# Altium PCB STM32H743I-EVAL2PCBDESIGN.PcbDoc (part 20 of 23)
Units mil, origin at the board's own origin, x right, y up, seen from the top; angles counter-clockwise.
Board outline 6558 x 5417 mil, 8 copper layers (L1_TOP, L2_GND, L3_HS1, L4_POWER, L5_SIG, L6_HS2, L7_GND, L8_BOTTOM), stack 61.368 mil thick; 620 components, 588 nets, 2945 pads, 1724 vias.
Unrouted connection lines stored in the file: 1.
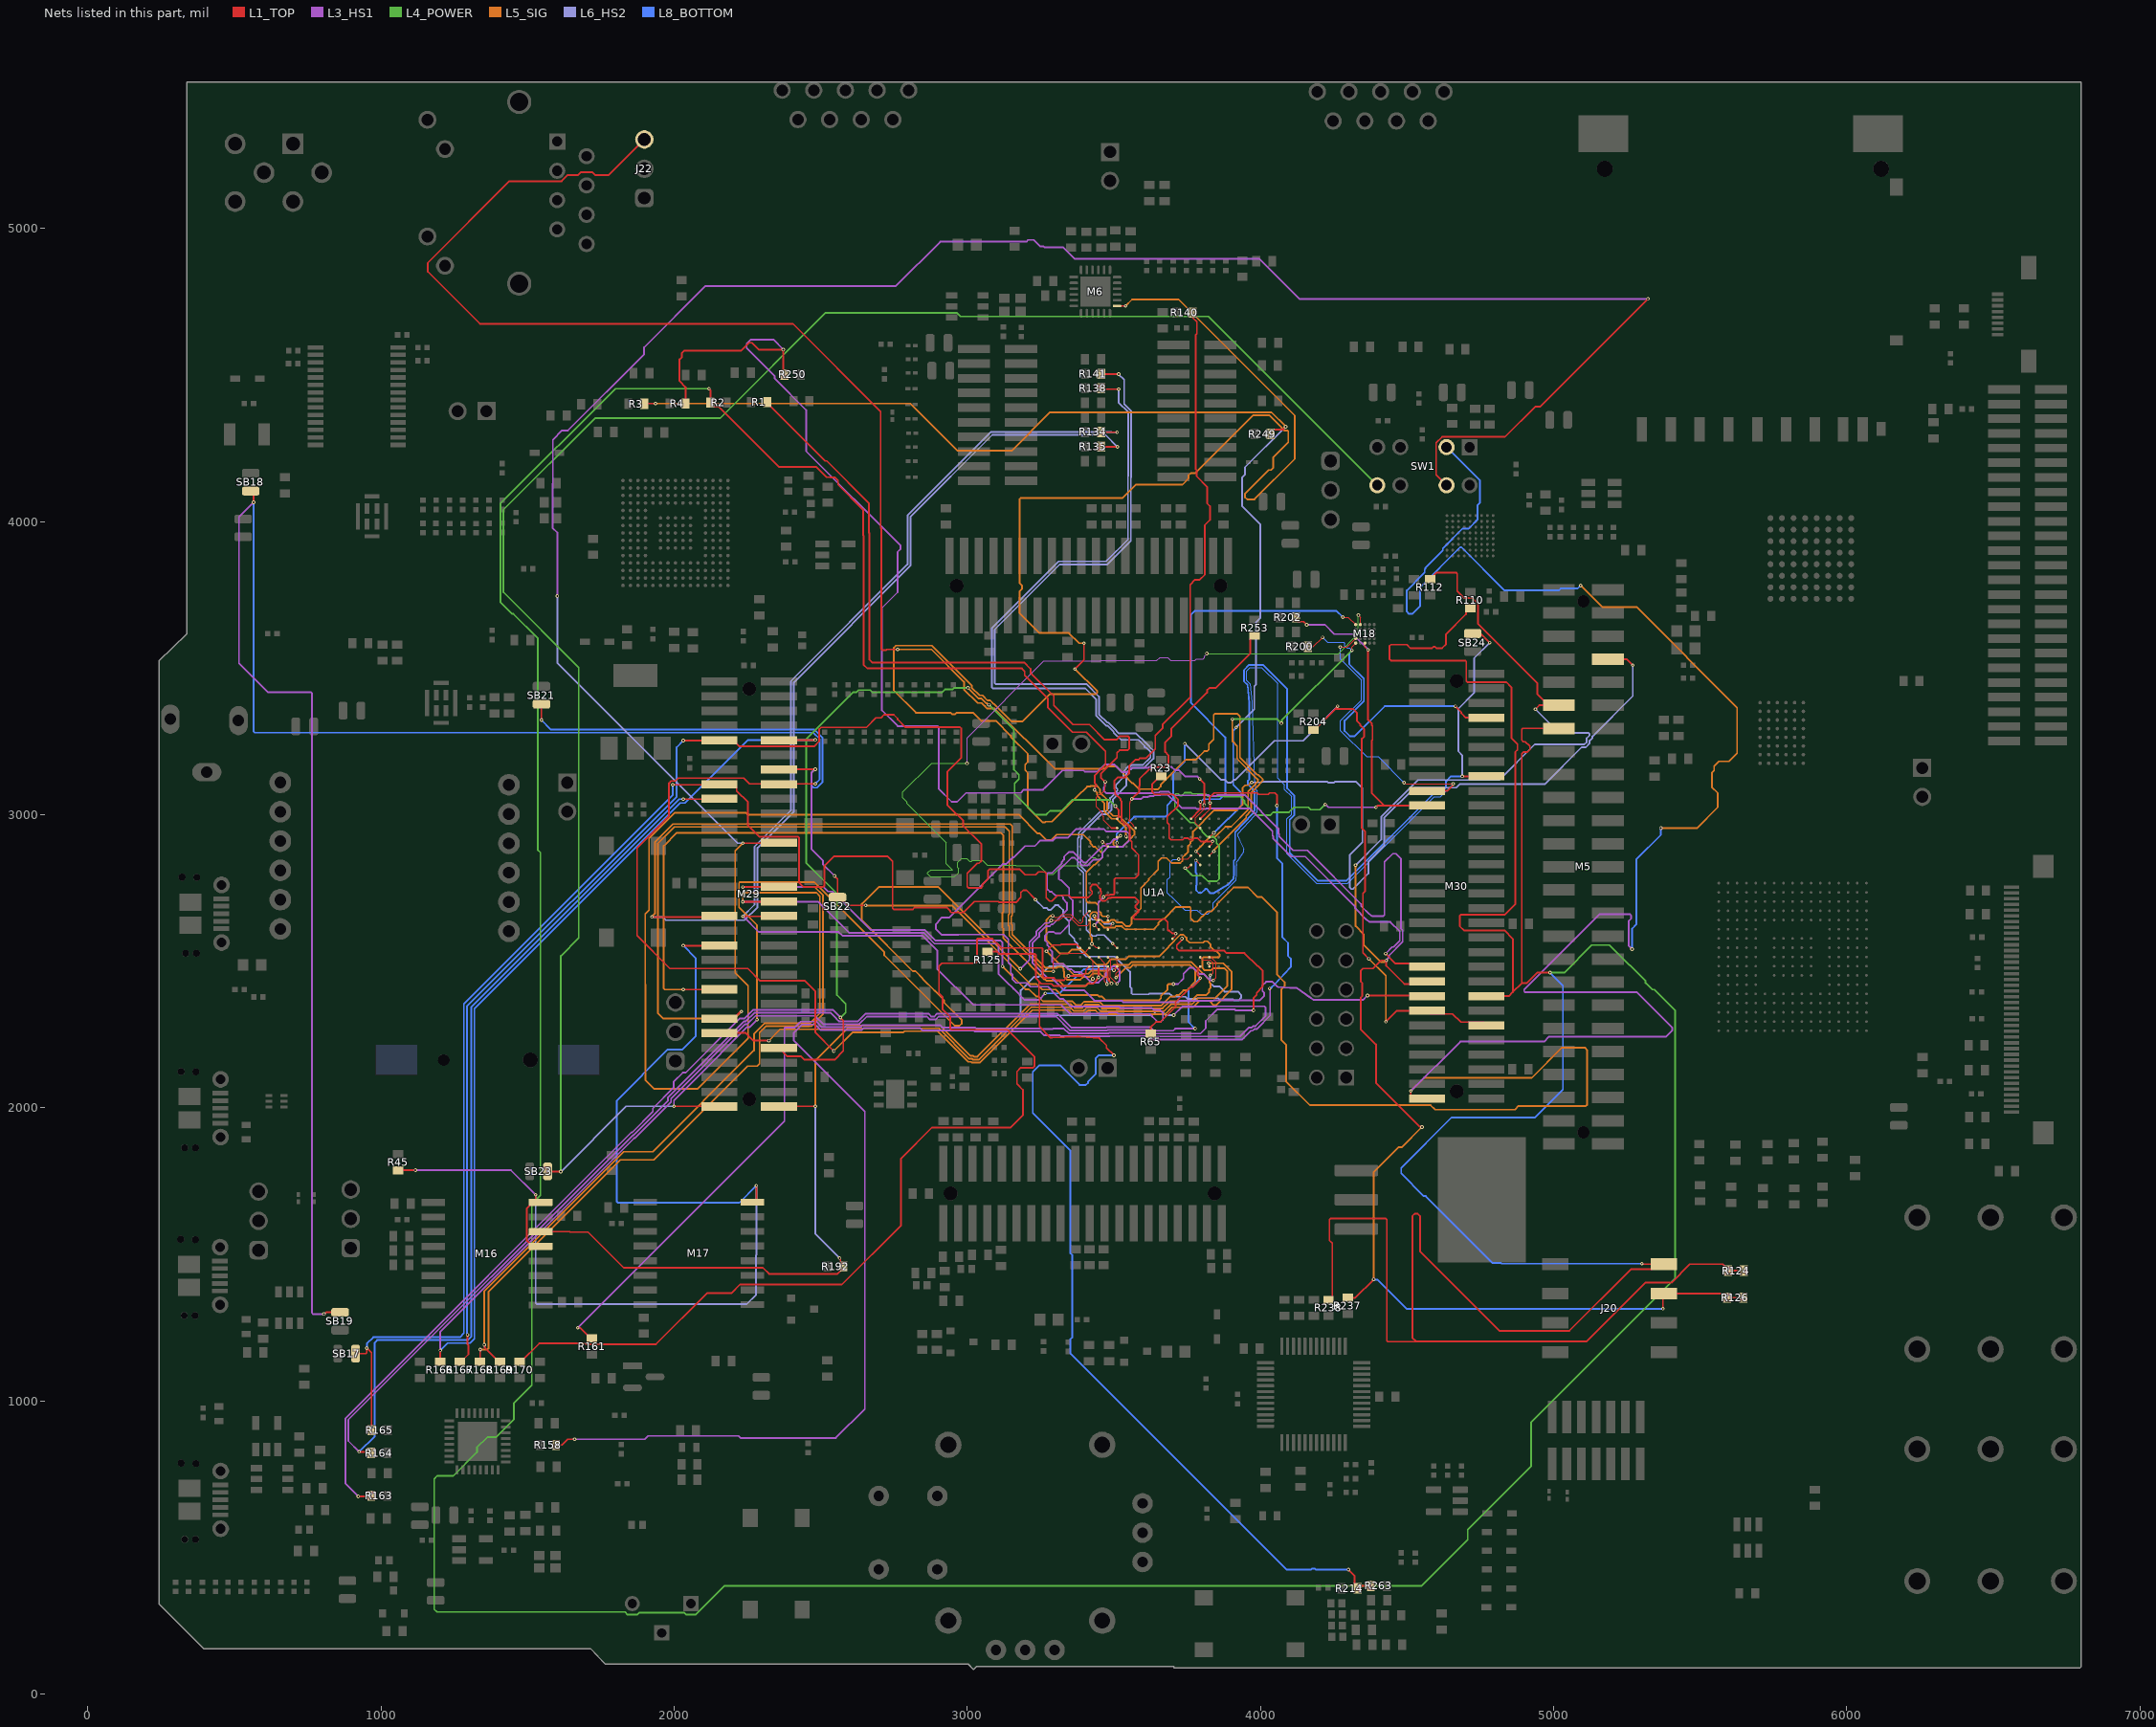
[diagram p17: the nets of this part, all layers, seen from the top]

## Via types
v1: diameter 12, hole 6, L1_TOP to L8_BOTTOM, tented both sides, 1724 vias

## Nets (pads, with @x,y where several pads share a name; then routed paths per layer and width w, separated by ;. In a path a pad name is that pad's centre, name@x,y a point inside that pad or via, vN(x,y) a via of type N, cw(c..) or ccw(c..) an arc to the next point about the centre after c; other vN are vias at no path point) (continued)
PA1: R141.1 U1A.N4 | length 2928.2
  L1_TOP w2: U1A.N4@3479.54,2608.02 3479.54,2609.78 3496,2626.24 v1(3496,2628)
  L1_TOP w6: R141.1@3456.56,4504 3457.56,4503 v1(3516,4503)
  L6_HS2 w6: v1(3496,2628) 3467.78,2628 3454.29,2641.49 3427.69,2641.49 3406,2663.17 3406,2804.95 3386.51,2824.44 3386.51,2914.9 3390,2918.38 3390,2933.72 3457.28,3001 3475.67,3001 3492,3017.33 3492,3023.61 3492,3034.38 3497,3039.38 3497,3052.38 3522.06,3077.44 3522.06,3079.53 3542.52,3099.99 3542.52,3143.52 3554,3155 3559.67,3155 3564.67,3160 3603.67,3160 3635,3191.33 3635,3218.67 3608.76,3244.91 3608.14,3244.91 3576.05,3277 3516.62,3277 3509,3284.62 3509,3286.67 3481.67,3314 3477.53,3314 3449,3342.53 3449,3403 3407,3445 3097,3445 3093.49,3448.51 3093.49,3632.01 3315.47,3854 3477.72,3854 3558,3934.28 3558,4151.09 3559,4152.09 3559,4377.18 3535,4401.18 3535,4484 v1(3516,4503)
PA1_C: M29.18 U1A.T2 | length 2675.5
  L1_TOP w4: U1A.T2@3416.54,2513.54 3428.97,2501.11 3428.97,2440.97 v1(3428,2440)
  L1_TOP w6: v1(2031,2403) M29.18@2153.5,2403
  L5_SIG w6: v1(2031,2403) 1967.51,2403 1964,2406.51 1964,2893.43 2008.57,2938 3114.49,2938 3123,2929.49 3123,2669.1 3120,2666.1 3120,2613.9 3123,2610.9 3123,2577.72 3193.72,2507 3194.67,2507 3214,2487.67 3214,2486.72 3262.72,2438 3265,2438 3270,2433 3313.43,2433 3331.43,2415 3403,2415 v1(3428,2440)
PA2: R140.1 U1A.N3 | length 2471.2
  L1_TOP w2: v1(3433.07,2622.99) U1A.N3@3448.04,2608.02
  L1_TOP w6: v1(3465,2719) 3466.62,2719 3473.2,2725.58 3485.05,2725.58 3486.47,2727 3498.52,2727 3502.03,2730.51 3502.03,2779.96 3505.55,2783.47 3573.22,2783.47 3583.02,2793.27 3583.02,2800.73 3584,2801.7 3584,2862.74 3561,2885.74 3561,2907.69 3554,2914.69 3554,2953.29 3551.53,2955.76 3551.53,2958.21 3543.39,2966.35 3538.76,2966.35 3526,2979.11 3526,3046.13 3523,3049.13 3523,3052.38 3504,3071.38 3504,3074.38 3504,3086.13 3501.2,3088.93 3501.2,3114.51 3514.15,3127.46 3539.05,3127.46 3552,3140.42 3552,3166.29 3573.57,3187.86 3584.25,3187.86 3588.38,3192 3608.51,3192 3641,3224.49 3641,3268.28 3641,3269.62 3666,3294.62 3666,3307.28 3760,3401.28 3760,3784.88 3776.85,3801.73 3793.15,3801.73 3810,3818.58 3810,3987.88 3828,4005.88 3828,4052.53 3818,4062.53 3818,4118.73 3782.22,4154.51 3782.22,4176.23 3778.51,4179.94 3778.51,4635.98 3783.05,4640.52 3783.05,4681.48 3768.56,4695.97 R140.1@3768.56,4713
  L3_HS1 w6: v1(3433.07,2622.99) 3447,2636.92 3447,2701 v1(3465,2719)
PA3: R170.1 U1A.U2 | length 3753.2
  L1_TOP w6: R170.1@1473,1133.56 1476.94,1133.56 1539.38,1196 1695.16,1196 1698.38,1192.78 1937.55,1192.78 2112.78,1368 2195.95,1368 2224.76,1396.81 2571.91,1396.81 2774,1598.9 2774,1827.14 2879.64,1932.78 3148.32,1932.78 3189.57,1974.03 3189.57,2061.33 3169.28,2081.62 3169.28,2123.26 3182.8,2136.78 3224.62,2136.78 3228.72,2140.88 3228.72,2174.36 3136.78,2266.3 2945.23,2266.3 2941.72,2269.82 2941.72,2309.38 2916,2335.1 2916,2376.86 2903,2389.86 2903,2482.91 2913.21,2493.12 2929.63,2493.12 2929.8,2492.95 3029.49,2492.95 3033,2496.47 3033,2576 3034,2577 3084.9,2577 3116.9,2545 3253.49,2545 3257,2541.49 3257,2447.28 3261.28,2443 3295.62,2443 3303.62,2435 3330,2435 3343.38,2448.38 3343.38,2450 3393,2450 3404.15,2461.15 3404.15,2469.64 U1A.U2@3416.54,2482.04
  other v1: 3345,2450
PA4: R125.2 R214.2 R263.1 U1A.U3 | length 3771.4
  L1_TOP w6: R125.2@3069,2532.56 3101.05,2532.56 3108.61,2525 3230.49,2525 3234,2521.49 3234,2442 3244.46,2431.54 ; U1A.U3@3448.04,2482.04 3447.52,2481.52 3447.52,2445.52 v1(3447,2445) 3447,2443.38 3441,2437.38 3441,2434.62 3429.38,2423 3408.38,2423 3400.38,2415 3295.33,2415 3287.33,2423 3253,2423 3244.46,2431.54 ; v1(3500,2179) 3474.67,2204.33 3474.67,2213.08 3450.48,2237.27 3385.44,2241.8 ccw(c3378.28,2138.98) 3374.71,2241.99 3289.09,2239.02 3284.12,2239.02 3246,2277.14 3246,2374.51 3244.46,2376.05 3244.46,2431.54 ; v1(4300.3,423.7) 4320.78,403.22 4320.78,370.78 R214.2@4331.56,360 4340.56,369 R263.1@4376.44,369
  L8_BOTTOM w6: v1(3500,2179) 3448.1,2179 3438.38,2169.28 3438.38,2116 3412,2089.62 3412,2085.62 3404.38,2078 3382.84,2078 3315.84,2145 3245.37,2145 3223,2122.63 3223,1982.81 3351,1854.81 3351,1503.67 3358,1496.67 3358,1217.19 3351,1210.19 3351,1163 4090.3,423.7 4171.32,423.7 4174.62,427 4185.38,427 4188.68,423.7 v1(4300.3,423.7)
PA5: R161.1 U1A.T3 | length 4544.2
  L1_TOP w4: U1A.T3@3448.04,2513.54 3468.09,2493.48 3468.09,2431.06 3476,2423.16 v1(3476,2422)
  L1_TOP w6: v1(1671,1249) 1679.62,1249 1715.06,1213.56 R161.1@1719,1213.56
  L3_HS1 w6: v1(1671,1249) 2376,1954 2376,2270.49 2379.51,2274 2411.72,2274 2431.72,2294 2484.95,2294 2503.95,2275 2635.29,2275 2642.29,2282 2906.01,2282 2914.01,2274 3026.43,2274 3030.43,2270 3253.86,2270 3254.76,2269.09 3291.62,2269.09 3292.53,2270 3329.38,2270 3345.38,2254 3482.04,2254 3483.04,2255 3615.9,2255 3627.9,2243 3930.49,2243 3961.49,2274 3970.38,2274 3974.8,2278.41 3982.94,2278.41 4017,2312.47 4017,2342.49 4013.49,2346 3848.86,2346 3847.86,2345 3733,2345 v1(3704,2316)
  L6_HS2 w6: v1(3476,2422) 3476,2478.63 3472.49,2482.14 3278.95,2482.14 3243.57,2446.76 3228.24,2446.76 3182,2400.53 3182,2322.86 3189.86,2315 3630.47,2315 3644.47,2329 3663.53,2329 3676.53,2316 v1(3704,2316)
PA6: M5.43 U1A.R3 | length 3354.8
  L1_TOP w2: v1(3425,2559) 3437.9,2546.1 3446.97,2546.1 U1A.R3@3448.04,2545.03
  L1_TOP w6: M5.43@5185.32,3530.62 5249.38,3530.62 v1(5270,3510)
  L5_SIG w6: v1(3425,2559) 3425,2579.5 3419,2585.5 3419,2659 3427.49,2667.49 3429.37,2667.49 3438.46,2667.49 3446.07,2659.87 3446.07,2650.79 3446.07,2648.91 3461.98,2633 3482.62,2633 3490.62,2641 3501.38,2641 3509.38,2633 3527,2633 3531,2629 3531.62,2629 3541.61,2619 3552.38,2619 3560,2626.62 3560,2648 3591.99,2679.99 3591.99,2749.9 3619.05,2776.95 3619.05,2781.11 3651,2813.06 3651,2840.4 3662.6,2852 3679.47,2852 3696.47,2835 3726.38,2835 3734,2842.62 3734,2854.63 3743.37,2864 3744.38,2864 3753.42,2873.03 3753.42,2893.46 3761.03,2901.07 3761.03,2906.35 3769.47,2914.79 3769.47,2942.57 3841.9,3015 3919.4,3015 3939,3034.6 3939,3091.92 3947.45,3100.37 3958.55,3100.37 3968.18,3110 v1(3969.81,3110)
  L6_HS2 w6: v1(3969.81,3110) 4001.62,3110 4004.62,3113 4015.38,3113 4016.38,3112 4228.66,3112 4231.47,3109.19 4250.53,3109.19 4253.34,3112 4326.81,3112 4348,3090.81 4348,2906.6 4305,2863.6 4305,2751.24 4310.14,2746.1 4315.11,2746.1 4368.38,2799.38 4368.38,2840.34 4422,2893.95 4422,2988.81 4525.19,3092 4668,3092 4680,3104 4969.38,3104 5095.38,3230 5109.53,3230 5123,3243.47 5123,3252.67 5132.51,3262.18 5132.51,3267.13 5270,3404.62 v1(5270,3510)
PA7: R138.1 U1A.R5 | length 2945
  L1_TOP w2: v1(3496.06,2560) U1A.R5@3511.03,2545.03
  L1_TOP w6: R138.1@3456.56,4455 3459.56,4452 v1(3516,4452)
  L6_HS2 w6: v1(3496.06,2560) 3466.54,2589.53 3441.91,2589.53 3438.38,2586 3427.62,2586 3406.05,2607.57 3406.05,2648.98 3396,2659.03 3396,2800.81 3376.51,2820.3 3376.51,2919.04 3380,2922.53 3380,2937.86 3453.14,3011 3471.53,3011 3482,3021.47 3482,3038.53 3487,3043.53 3487,3056.53 3512.06,3081.59 3512.06,3086.56 3507.2,3091.42 3507.2,3102.18 3532.52,3127.5 3532.52,3147.66 3549.86,3165 3555.53,3165 3560.53,3170 3599.53,3170 3625,3195.47 3625,3206.81 3625,3214.53 3611.53,3228 3607.57,3228 3604.06,3231.51 3604.06,3234.85 3583.74,3255.17 3524.31,3255.17 3499,3280.47 3499,3282.53 3477.53,3304 3473.38,3304 3439,3338.38 3439,3394 3402,3431 3087,3431 3083.49,3434.51 3083.49,3636.15 3311.33,3864 3473.57,3864 3548,3938.43 3548,4155.23 3549,4156.23 3549,4373.04 3516,4406.04 v1(3516,4452)
PA8: J22.3 U1A.E15 | length 5712
  L1_TOP w2: U1A.E15@3825.99,2859.99 v1(3840.96,2874.96)
  L1_TOP w6: J22.3@1898,5304 1776.57,5182.57 1729.78,5182.57 1719.78,5192.57 1682.04,5192.57 1672.04,5182.57 1636.76,5182.57 1615.64,5161.46 1437.69,5161.46 1159,4882.76 1159,4853 1337.24,4674.76 2405.1,4674.76 2704,4375.86 2704,3979.14 2706,3977.14 2706,3565.14 2709.51,3561.62 2723.04,3561.62 2725.42,3564 v1(2762,3564)
  L5_SIG w6: v1(2762,3564) 2878,3564 2988.74,3453.26 2988.74,3427.36 3035.1,3381 3049.19,3381 3060.19,3370 3060.62,3370 3068.62,3362 3093.28,3362 3298.28,3157 3469.72,3157 3477.72,3165 3507,3165 3548,3124 3548,3121.47 3561.47,3108 3564,3108 3585,3087 3637.62,3087 3638.62,3086 3649.38,3086 3659.62,3096.23 3659.62,3102.14 3745.47,3188 3779.62,3188 3808.39,3216.78 3818.14,3216.78 3824,3222.64 3824,3240.47 3840,3256.47 3840,3340.49 3843.51,3344 3922,3344 3930,3336 3930,3195.06 3988.97,3136.1 3992.29,3136.1 4007.51,3120.87 4007.51,3115.9 3997,3105.38 3997,3103.34 3968,3074.34 3968,3013.13 3951,2996.13 3951,2989 3842.11,2880.11 3842.11,2876.11 v1(3840.96,2874.96)
PA9: R23.2 U1A.D15 | length 501.1
  L1_TOP w2: U1A.D15@3825.99,2891.49 3835.09,2900.58 3835.09,2907.09 v1(3837,2909)
  L1_TOP w6: R23.2@3661,3131.44 3657.06,3131.44 3631,3105.38 3631,3077.21 3638.71,3069.5 3701.5,3069.5 3719,3052 3719,3030.42 3682.01,2993.43 3682.01,2972.48 3688.26,2966.23 3688.26,2920.25 3694.51,2914 3734.44,2914 3739.9,2919.46 3753.49,2919.46 3758.39,2914.56 3769.24,2914.56 3774.14,2919.46 3786.1,2919.46 3796.56,2909 v1(3837,2909)
PA13: R3.1 R249.1 U1A.C15 | length 3978.6
  L1_TOP w2: U1A.C15@3825.99,2922.98 v1(3840.96,2937.95)
  L1_TOP w6: R3.1@1898.12,4402 1899.12,4403 v1(1936,4403) ; R249.1@4034.56,4299 4034.56,4302.94 4045.34,4313.72 4075.07,4313.72 4085.35,4324 v1(4086,4324)
  L5_SIG w6: v1(1936,4403) 2805.38,4403 2966.38,4242 3151.62,4242 3282.62,4373 4037,4373 v1(4086,4324)
  L6_HS2 w6: v1(3917,3298) 3979,3360 3979,3438.33 3985,3444.33 3985,3656.47 3999,3670.47 3999,3991.72 3937,4053.72 3937,4149.85 3947,4159.85 3947,4185 v1(4086,4324)
  L8_BOTTOM w6: v1(3840.96,2937.95) 3842.35,2937.95 3936.01,3031.61 3936.01,3072.47 3907,3101.47 3907,3286.79 3917,3296.79 v1(3917,3298)
PA14: R4.1 R250.1 U1A.B14 | length 3901.3
  L1_TOP w4: U1A.B14@3794.5,2954.48 3778.46,2970.52 3778.46,2988.71 3808,3018.25 v1(3808,3033)
  L1_TOP w6: R4.1@2038.56,4403 2038.56,4458.93 2018.1,4479.38 2018.1,4553.34 2026,4561.24 2026,4575.38 2033.62,4583 2227.62,4583 2254.62,4610 2265.38,4610 2288.38,4587 v1(2372,4587) 2372,4506.44 R250.1@2376.44,4502 ; v1(3793,3122) 3808,3107 v1(3808,3033)
  L3_HS1 w6: v1(2372,4587) 2338,4621 2261.14,4621 2247,4606.86 2247,4591.62 2343,4495.62 2343,4487.92 2450,4380.92 2450,4240.43 2772,3918.43 2772,3906.38 2762,3896.38 2762,3759 2708.12,3705.12 2708.12,3356.27 2762.38,3302 2898.49,3302 2902,3298.49 2902,3088.47 2946.47,3044 2965.53,3044 2995.53,3074 3181.81,3074 3192.81,3085 3258,3085 3267,3094 3324,3151 3396.56,3151 3400.56,3147 3444.57,3147 3468.57,3171 3502.19,3171 3528.19,3145 3545.47,3145 3560.47,3160 3617.81,3160 3620.81,3163 3697,3163 3708,3152 3721.33,3152 3743.33,3130 3785,3130 v1(3793,3122)
PA15: R158.1 U1A.A14 | length 5327.2
  L1_TOP w6: R158.1@1596.56,849 1616.96,849 1636.96,869 v1(1660,869) ; U1A.A14@3794.5,2985.98 3828,3019.48 v1(3828,3040) 3826.85,3041.15 3826.85,3051.15 3826,3052 3826,3058 3842,3074 3989.33,3074 3994.33,3069 4025.67,3069 4030.67,3074 4049.86,3074 4056,3067.86 v1(4056,3031)
  L3_HS1 w6: v1(1660,869) 1900,869 1911,880 2219,880 2226,873 2551,873 2650,972 2650,1986.43 2408,2228.43 2408,2256.14 2435.86,2284 2480.81,2284 2499.81,2265 2639.43,2265 2646.43,2272 2838.43,2272 2846.43,2264 3022.29,2264 3026.29,2260 3249.72,2260 3262.72,2247 3315.62,2247 3318.62,2244 3486.18,2244 3487.18,2245 3611.76,2245 3623.76,2233 3937.53,2233 3955.53,2251 3956.14,2251 3967.86,2262.72 3973.24,2262.72 3978.94,2268.41 3987.09,2268.41 4033,2314.33 4033,2400.67 4031.15,2402.52 v1(4031.15,2406.85)
  L8_BOTTOM w6: v1(4031.15,2406.85) 4032.77,2406.85 4036.92,2411 4038.08,2411 4047.36,2420.28 4047.54,2420.47 4104,2482 4104,2507.53 4094,2517.53 4094,2562.33 4075,2581.33 4075,2833 4056,2852 v1(4056,3031)
PB0: M29.29 R169.1 U1A.U5 | length 4179.1
  L1_TOP w6: v1(1352,1191) 1353.15,1189.85 1353.15,1182.47 1402.06,1133.56 R169.1@1406,1133.56 ; v1(2233.99,2703) M29.29@2356.5,2703 ; v1(3500,2469) 3500,2470.23 3511.03,2481.27 U1A.U5@3511.03,2482.04
  L3_HS1 w6: v1(2233.99,2703) 2490.52,2703 2596.52,2597 2850.72,2597 2887.72,2560 3102.49,2560 3106,2556.49 3106,2457.47 3134,2429.47 3157.43,2406 3195.47,2368 3244,2368 v1(3266,2390)
  L5_SIG w6: v1(1352,1191) 1352,1374.38 1827.62,1850 1926.53,1850 2272,2195.47 2272,2252 2308,2288 2462.57,2288 2497,2322.43 2497,2721.57 2484.57,2734 2240,2734 2233.99,2727.99 v1(2233.99,2703)
  L8_BOTTOM w6: v1(3266,2390) 3314.62,2390 3397.62,2473 3494.38,2473 3498.38,2469 v1(3500,2469)
PB1: M29.31 R168.1 U1A.T5 | length 4889.6
  L1_TOP w4: v1(3507,2444) 3507,2459.03 3520.03,2472.06 3520.03,2485.77 3511.03,2494.77 U1A.T5@3511.03,2513.54
  L1_TOP w6: R168.1@1337,1133.56 1338,1134.56 v1(1338,1175) ; v1(2233.99,2753) M29.31@2356.5,2753
  L3_HS1 w6: v1(2233.99,2753) 2510.05,2753 2525.05,2738 2539.19,2738 2670.19,2607 2854.86,2607 2891.86,2570 3113.49,2570 3120,2563.49 v1(3120,2482)
  L5_SIG w6: v1(1338,1175) 1362.49,1175 1366,1178.51 1366,1372 1816,1822 1930,1822 2250,2142 2283.39,2142 2291.01,2149.62 2291.01,2256.87 2312.14,2278 2466.72,2278 2507,2318.28 2507,2725.72 2479.72,2753 v1(2233.99,2753) ; v1(3120,2482) 3198,2404 3210.38,2404 3234.38,2380 3241.27,2380 3258.27,2363 3358.09,2363 3370.2,2350.89 3387.59,2350.89 3398.7,2362 3450.27,2362 3463.27,2349 3662.05,2349 3693.05,2380 3708.7,2380 3712.7,2384 3720.38,2384 3737.07,2400.69 3748.07,2400.69 3777,2429.62 3777,2470.38 3760.38,2487 3564.1,2487 3554.1,2477 3540,2477 v1(3507,2444)
PB2: M16.13 M16.16 M17.16 M29.24 R45.1 | length 3983.4
  L1_TOP w6: R45.1@1058,1786 1059,1787 v1(1117,1787) ; v1(1527,1703) 1527,1685.81 M16.16@1535.81,1677 ; M16.13@1544.27,1527 1515.92,1527 1497.11,1545.81 1497.11,1657.24 1507.11,1667.24 1507.11,1668.19 1515.92,1677 M16.16@1535.81,1677 ; M16.16@1544.27,1677 M16.16@1535.81,1677 ; v1(2031,2553) M29.24@2153.5,2553 ; M17.16@2267.27,1678 2271.19,1678 2280,1686.81 v1(2280,1734)
  L3_HS1 w6: v1(1117,1787) 1443,1787 v1(1527,1703)
  L6_HS2 w6: v1(1527,1703) 1527,1333.51 1530.51,1330 2246.86,1330 2279.19,1362.34 2279.19,1496.81 2280,1497.61 v1(2280,1734)
  L8_BOTTOM w6: v1(2031,2553) 2073,2511 2073,2243.86 2027.64,2198.5 1978.42,2198.5 1804,2024.08 1804,1679.51 1807.51,1676 2222,1676 v1(2280,1734)
PB3: J20.01 M5.38 M30.15 R2.2 R110.2 R124.1 R124.2 R238.1 U1A.C6 | length 23333.4
  L1_TOP w2: v1(3541,2926) 3542.53,2924.47 U1A.C6@3542.53,2922.98
  L1_TOP w6: v1(2118.49,4453.39) 2123.44,4448.44 R2.2@2123.44,4406 2123.44,4402.06 2134.22,4391.28 2151.88,4391.28 2356.27,4186.9 2483.76,4186.9 2519.3,4151.36 2533.6,4151.36 2534.62,4150.34 2548.76,4150.34 2558.72,4140.38 2558.72,4126.24 2644,4040.95 2644,3954.28 2646,3952.28 2646,3512.28 2659.28,3499 3186,3499 3195.54,3489.46 3195.54,3475.89 3275,3396.43 3275,3364.57 3358.34,3281.23 3406.15,3281.23 3471.49,3215.89 3471.49,3170.3 3435,3133.81 3435,3107.12 3439,3103.12 3439,3098.15 3435.15,3094.3 3435.15,3086.15 v1(3434,3085) ; R238.1@4232,1344.56 4234.22,1344.56 4245,1355.34 4245,1537.45 4235.43,1547.03 4235.43,1617.91 4240,1622.49 4426.43,1622.49 4431.01,1617.91 4431.01,1205.51 4434.52,1202 4530.37,1202 ; R110.2@4716,3704.44 4712.06,3704.44 4701.28,3693.66 4701.28,3684.28 4633,3616 4633,3581.47 4619.53,3568 4600.47,3568 4595.22,3573.25 4590.25,3573.25 4585,3568 4511.61,3568 4499.61,3580 4445,3580 4440,3575 4440,3531 4445.25,3525.75 4698.41,3525.75 4701.92,3522.24 4701.92,3455.51 4705.44,3452 4839,3452 4856,3435 4856,3261.38 4876.85,3240.53 4876.85,3221.47 4869,3213.62 4869,2693.6 4834.4,2659 4683.61,2659 4680.09,2655.49 4680.09,2619.42 4694.57,2604.95 4832.46,2604.95 4861,2576.4 4861,2394.75 ; M30.15@4770.99,2381 4847.25,2381 4861,2394.75 ; v1(4988,2461) 4943.47,2461 4907.44,2424.97 4891.22,2424.97 ; M5.38@5018,3294.4 4894.74,3294.4 4891.22,3290.89 4891.22,3254.44 4896.85,3248.81 4903.57,3248.81 4919,3233.38 4919,3222.62 4909.57,3213.19 4896.85,3213.19 4891.22,3207.56 4891.22,2424.97 ; v1(5301,1468) 5302.62,1468 5304.62,1466 J20.01@5351.04,1466 ; J20.01@5375.94,1466 J20.01@5351.04,1466 ; R124.1@5649.56,1444 R124.2@5594.44,1444 5594.44,1447.94 5576.38,1466 5465.04,1466 5402.12,1403.08 5313.22,1403.08 5113.14,1203 4530.37,1203 4518,1215.37 4518,1630.38 4525.62,1638 4536.38,1638 4545,1629.38 4545,1508.95 4815.03,1238.92 5053.94,1238.92 5263.94,1448.92 5333.96,1448.92 J20.01@5351.04,1466 ; 4861,2394.75 4891.22,2424.97
  L4_POWER w6: v1(2118.49,4453.39) 1799.39,4453.39 1407,4061 1407,3726 1447.81,3685.19 1451.19,3685.19 1534,3602.38 1534,2880.17 1543.28,2870.89 1543.28,1700.9 1514,1671.62 1514,1053 1453.19,992.19 1453.19,936.81 1392.38,876 1362.04,876 1326.71,840.67 1326.71,824.33 1246.38,744 1191.51,744 1181,733.49 1181,288.51 1190.26,279.26 1832,279.26 1841.26,270 1872.74,270 1879.5,276.76 2034.5,276.76 2041.26,270 2072.74,270 2170.74,368 4548.53,368 4707,526.47 4707,560.38 4923,776.38 4923,926.38 5415,1418.38 5415,2331.53 5343.53,2403 5336.62,2403 5314,2425.62 5314,2432.53 5260.26,2486.26 5259.35,2486.26 5190.62,2555 5130.47,2555 5036.47,2461 v1(4988,2461)
  L5_SIG w6: v1(3434,3085) 3434,3083.38 3443,3074.38 3443,3067.38 3443.38,3067.01 3443.38,3064 3462,3045.38 3462,3044.38 3467,3039.38 3467,3012.05 3493.05,2986 3509.45,2986 3541,2954.45 v1(3541,2926)
  L8_BOTTOM w6: v1(4988,2461) 5032,2417 5032,2061.62 4937.38,1967 4652.33,1967 4480,1794.67 4480,1775.86 4557.36,1698.5 4563.88,1698.5 4792.38,1470 4820.62,1470 4822.62,1468 v1(5301,1468)
PB4: M30.20 R253.1 U1A.B7 | length 2283.6
  L1_TOP w4: v1(3561,3054) 3561,3051.84 3556,3046.84 3556,3041.97 3555,3040.97 3555,2986.19 3551.53,2982.73 3551.53,2979.41 3566.53,2964.42 3566.53,2961.98 U1A.B7@3574.02,2954.48
  L1_TOP w6: v1(3561,3054) 3586.76,3079.76 3586.76,3097.76 3588,3099 3588,3122.53 3619.47,3154 3628.02,3154 3636.24,3162.22 3678.06,3162.22 3685.72,3169.88 3685.72,3203.24 3675,3213.95 3675,3247.38 3696,3268.38 3696,3294.23 3818,3416.23 3818,3424.38 3825.62,3432 3847,3432 3965.28,3550.28 3965.28,3599.66 3976.06,3610.44 R253.1@3980,3610.44 ; v1(4427,2526) 4461,2492 4557,2492 M30.20@4568,2481
  L3_HS1 w6: v1(3561,3054) 3593.62,3054 3599.62,3060 3615.62,3060 3617.62,3062 3621.76,3062 3622.76,3063 3634.86,3063 3637.86,3066 3657.67,3066 3659.67,3068 3683.53,3068 3701.53,3050 3704.53,3050 3731.53,3023 3778.8,3023 3781.8,3020 3813.38,3020 3814.34,3020.95 3963.76,3020.95 4041,2943.71 4041,2928.95 4044,2925.95 4044,2917.47 4104.47,2857 4152.92,2857 4322.46,2687.46 4322.46,2683.62 4323.13,2681.45 4323.57,2680.03 4359.84,2643.76 4370.35,2635.32 4370.47,2635.23 4372.08,2634 4374.11,2634 4442.86,2634 4475,2601.86 4475,2570.28 4453.43,2548.72 4449.72,2548.72 v1(4427,2526)
PB5: M29.09 R163.1 U1A.A5 | length 5537.4
  L1_TOP w6: v1(922,674) 964.44,674 R163.1@966.44,676 ; M29.09@2357.5,2204 2386.5,2175 2433.39,2175 2444.38,2164 2547,2164 2577,2194 2577,2296.79 2567,2306.79 v1(2567,2308) ; v1(3505,3029) 3505,3027.38 3516,3016.38 3516,2990.94 U1A.A5@3511.03,2985.98
  L3_HS1 w6: v1(922,674) 922,675.14 878,719.14 878,939.67 1854.33,1916 1856.38,1916 1927.19,1986.81 1927.19,1997.62 1998,2068.43 1998,2088.38 2029.12,2119.5 2038.89,2119.5 2224.38,2305 2240.33,2305 2268.95,2333.62 2542.38,2333.62 2567,2309 v1(2567,2308)
  L4_POWER w6: v1(2567,2308) 2568.38,2308 2585,2324.62 2585,2354.38 2554.76,2384.62 2554.76,2730.85 2450,2835.62 2450,3257.43 2610.57,3418 2622.43,3418 2629.43,3425 2668.57,3425 2675.57,3418 2914.59,3418 2923.59,3427 2949.05,3427 2954.79,3432.74 v1(3001.74,3432.74) ; v1(3074,3375) 3159,3290 3159,3153.22 3176.02,3136.2 3176.02,3121.29 3161,3106.27 3161,3070.47 3231.47,3000 3269.5,3000 3282.5,3013 3320.53,3013 3358.53,3051 3393.62,3051 3483,3051 v1(3505,3029)
  L5_SIG w6: v1(3001.74,3432.74) 3037.46,3397.02 3047.31,3397.02 3064.33,3380 3067.38,3380 3072.38,3375 v1(3074,3375)
PB6: J20.03 M5.40 M30.18 R1.2 R112.2 R126.1 R126.2 R237.1 U1A.B5 | length 9726.8
  L1_TOP w4: v1(3470.38,3112) 3470.38,3084.38 3455.23,3069.23 3449.23,3069.23 3440,3060 3440,3026.16 3461.54,3004.62 3461.54,2996.51 3465.04,2993.02 3465.04,2980.29 3490.85,2954.48
  L1_TOP w6: R1.2@2317.56,4408 2317.56,4404.06 2514.72,4206.9 2520.48,4206.9 2664,4063.38 2664,3962.57 2666,3960.57 2666,3528.8 2675.37,3519.43 3193.86,3519.43 3215.54,3497.75 3215.54,3484.18 3295,3404.72 3295,3372.86 3360.44,3307.42 3416.58,3307.42 3468.02,3255.98 3508.39,3255.98 3520.47,3268.06 3547.53,3268.06 3551.63,3263.95 3551.63,3224.3 3547.53,3220.2 3519.84,3220.2 3510.47,3210.82 3510.47,3195.14 3456,3140.67 3456,3125.15 3469.15,3112 v1(3470.38,3112) ; 3490.85,2954.48 U1A.B5@3511.03,2954.48 ; R237.1@4298,1351.56 4323.56,1351.56 v1(4386.5,1414.5) ; v1(4551,1934) 4549.85,1935.15 4544.47,1935.15 4394,2085.62 4394,2216 4342,2268 4342,2375.22 4347,2380.22 4347,2425.78 4342,2430.78 4342,2467 4350,2475 4383.67,2475 4411.67,2503 v1(4429,2503) 4429,2484 4491,2422 4559,2422 M30.18@4568,2431 ; R112.2@4578.67,3803.56 4601.11,3826 4667.49,3826 4671,3822.49 4671,3763.16 4695.38,3738.78 4723.06,3738.78 4742.03,3719.81 4742.03,3651.83 4944.27,3449.58 4944.27,3412.37 M5.40@4983.5,3373.14 ; v1(4938,3360) 4951.14,3373.14 M5.40@4983.5,3373.14 ; M5.40@5018,3373.14 M5.40@4983.5,3373.14 ; v1(5373,1314) 5373,1363.06 J20.03@5375.94,1366 5581.66,1366 5592.44,1355.22 R126.1@5592.44,1352 R126.2@5647.56,1352
  L3_HS1 w6: v1(3470.38,3112) 3469.24,3110.85 3469.24,3097.23 3465,3092.99 3465,3082.21 3474.21,3073 3630.72,3073 3633.72,3076 3653.53,3076 3655.53,3078 3687.67,3078 3699.67,3066 3784.47,3066 3785.47,3067 3822.54,3067 3826.54,3063 3848.43,3063 3852.43,3067 3946,3067 4061,2951.99 4061,2937.24 4064,2934.24 4064,2925.75 4111.75,2878 4123.35,2878 4160.2,2878 4343.57,2694.63 4343.57,2690.79 4343.57,2688.31 4347.08,2684.79 4367.54,2664.55 4367.74,2664.36 4378.71,2655.36 4380.37,2654 4382.51,2654 4419.49,2654 4423,2657.51 4423,2838.38 4451.62,2867 4462.38,2867 4479,2850.38 4479,2612 4485,2606 4485,2566.14 4438.76,2519.91 4438.76,2514.39 4429,2504.62 v1(4429,2503)
  L5_SIG w6: v1(4324.51,2827.51) 4324.51,2619.99 4353,2591.5 4353,2554.62 4411,2496.62 4420.99,2496.62 4427.38,2503 v1(4429,2503) ; v1(4386.5,1414.5) 4386.5,1780.88 4470.73,1865.12 4482.12,1865.12 v1(4551,1934)
  L6_HS2 w6: v1(4324.51,2827.51) 4412,2915 4412,2992.95 4537.05,3118 4814.38,3118 4936.38,3240 5105.38,3240 5113,3247.62 5113,3261 5122.51,3270.51 5122.51,3275.49 5119,3279 5019,3279 v1(4938,3360)
  L8_BOTTOM w6: v1(4386.5,1414.5) 4387.65,1413.35 4398.79,1413.35 4498.14,1314 v1(5373,1314)
PB7: M6.13 M30.16 U1A.C5 | length 8047
  L1_TOP w2: U1A.C5@3511.03,2922.98 3512.89,2922.98 3515.99,2926.09 3520.09,2926.09 v1(3522,2928)
  L1_TOP w6: v1(3367,3497) 3367.07,3497 3398,3527.93 v1(3398,3585) ; M6.13@3510.84,4735.79 v1(3539.79,4735.79) ; v1(4365,2383) 4566,2383 M30.16@4568,2381
  L3_HS1 w6: v1(3522,2928) 3511,2917 3501.38,2917 3485.38,2901 3477.5,2901 3470.5,2894 3462.62,2894 3424.58,2855.96 3424.58,2855.2 3406.38,2837 3395.62,2837 3359.86,2872.75 3346.61,2872.75 3330,2856.14 3330,2846.62 3322.38,2839 3322.38,2834 3289.38,2801 3275.51,2801 3272,2797.49 3272,2746.62 3281.62,2737 3287.38,2737 3299.38,2725 3319.38,2725 3327,2717.38 3327,2711.72 3339.49,2699.23 3339.49,2674.1 3291.38,2626 3287.14,2626 3281.14,2620 3269.02,2620 3245,2595.98 3245,2583.86 3222,2560.86 3222,2494.43 3272.43,2444 3286.95,2444 3324.62,2406.33 3324.62,2404.67 3328.28,2401 3397.47,2401 3433.47,2365 3526.24,2365 3531.24,2360 3719.72,2360 3724.72,2365 3839.57,2365 3840.57,2366 3997.38,2366 4013,2381.62 4013,2392.38 4007,2398.38 4007,2417.53 4019.33,2429.85 4040.67,2429.85 4056.19,2414.34 4057.72,2412.81 4059.87,2412.61 4099.64,2408.85 4102.32,2408.85 4104.47,2409 4123.53,2409 4171.62,2374.55 ccw(c4192,2403) 4172.64,2373.84 4181.44,2368 4350,2368 v1(4365,2383)
  L5_SIG w6: v1(3367,3497) 3442.89,3421.11 3442.89,3416.14 3438.26,3411.5 3281.5,3411.5 3188,3318 3151.43,3318 3091.43,3378 3089.38,3378 3077.38,3390 3068.47,3390 3051.45,3407.02 3041.7,3407.02 3014.74,3433.98 3014.74,3441.4 2879.14,3577 2756.62,3577 2749,3569.38 2749,3423.62 2824.62,3348 2942.62,3348 2947.62,3343 2958.38,3343 2963.38,3348 3019.54,3348 3047.54,3320 3097.53,3320 3148.49,3269.04 3148.49,3265.05 3206,3207.54 3206,3179.93 3197,3170.93 3197,3151.87 3206,3142.87 3206,3023.86 3255.86,2974 3265.47,2974 3267.47,2976 3288.62,2976 3373.22,3060.6 3408.62,3096 3419.38,3096 3421.38,3098 3441.38,3098 3453,3086.38 3453,3074.62 3477,3050.62 3477,3016.19 3497.19,2996 3517.83,2996 3570.5,2943.34 3570.5,2932.57 3562.88,2924.95 3562.88,2923.39 3530.49,2891 3505.62,2891 3498,2898.62 3498,2909.38 3506.73,2918.12 3510.67,2918.12 3520.55,2928 v1(3522,2928) ; v1(3398,3585) 3381,3585 3346,3620 3246.43,3620 3178,3688.43 3178,3761.62 3187,3770.62 3187,3781.38 3178,3790.38 3178,4076.49 3181.51,4080 3528.5,4080 3574.5,4126 3733.26,4126 3754,4146.74 3754,4157.38 3761.62,4165 3777,4165 3975,4363 4030,4363 4073,4320 4073,4318.62 4080.62,4311 4091.38,4311 4094.9,4307.49 4094.9,4271 4044,4220.1 4044,4183.62 4036.38,4176 4028.62,4176 3947,4094.38 3947,4083.62 3954.62,4076 3979.38,4076 4117,4213.62 4117,4361.82 3720.82,4758 3562,4758 v1(3539.79,4735.79)
PB8: M30.11 M30.14 R204.1 U1A.D5 | length 2877.5
  L1_TOP w2: U1A.D5@3511.03,2891.49 v1(3511,2904)
  L1_TOP w6: R204.1@4181,3289.44 4184.94,3289.44 4256.5,3361 ; v1(4263,3370) 4256.5,3363.5 4256.5,3361 ; v1(4370,2508) 4349.28,2528.72 4349.28,2731.64 4357.28,2739.64 4357.28,2942.57 4346,2953.85 4346,3258.99 4354,3266.99 4354,3291.01 4341,3304.01 4341,3307.98 4329,3319.98 4329,3348 4316,3361 4256.5,3361 ; v1(4427.68,2293.55) 4465.14,2331 M30.14@4568,2331 4579,2320 4655.49,2320 4683.5,2292 4760,2292 M30.11@4770.99,2281
  L5_SIG w6: v1(4370,2508) 4427.68,2450.32 v1(4427.68,2293.55)
  L6_HS2 w6: v1(3742,3242) 3864.47,3119.53 3878.09,3119.53 3888.62,3109 3899.38,3109 3909.91,3119.53 3915,3119.53 4047.47,3252 4145,3252 v1(4263,3370)
  L8_BOTTOM w6: v1(3511,2904) 3510.5,2904.5 3510.5,2919 3509,2920.5 3509,2933.38 3568.62,2993 3675.53,2993 3682,2999.47 3682,3032.38 3702,3052.38 3702,3141.75 3742,3181.75 v1(3742,3242)
PB9: M18.A2 U1A.D4 | length 3148.6
  L1_TOP w2: v1(3461,2907) 3462.51,2907 3478.02,2891.49 U1A.D4@3479.54,2891.49 ; v1(4334,3681) 4341,3674 4341,3648.74 M18.A2@4340.76,3648.5
  L3_HS1 w4: v1(2999,3175) 2999,3261.97 3261.03,3524 3452.89,3524 3454.89,3526 3646.75,3526 3656.75,3536 3683.25,3536 3693.25,3526 3776.75,3526 3781.75,3531 3804,3531 3809.73,3536.73 3809.73,3540.57 3817,3547.84 v1(3817,3550)
  L4_POWER w4: v1(2999,3175) 2878,3175 2780,3077 2780,3057.03 2794,3043.03 2794,3038 2928.28,2903.72 2928.28,2832.15 2948.43,2812 2875,2812 2867,2804 2866,2804 2863.66,2801.66 2863.66,2798.34 2874,2788 2955.89,2788 2969.43,2801.54 2969.43,2816.46 2967,2818.89 2967,2837.11 2979.89,2850 2998.11,2850 3008.11,2840 3014,2840 3017.93,2843.93 3052.18,2843.93 3068.11,2828 3164.17,2828 3166.17,2826 3243.89,2826 3273.89,2796 3293.11,2796 3323.11,2826 3396.03,2826 3423,2852.97 3436,2852.97 3439.97,2849 3452.97,2849 3460,2856.03 3460,2889.97 3461,2890.97 v1(3461,2907) ; v1(3817,3550) 3818,3549 4265.97,3549 4334,3617.03 v1(4334,3681)
PB10: M29.52 R167.1 U1A.P11 | length 5244
  L1_TOP w2: U1A.P11@3700.01,2576.53 3700.01,2578.38 3703.76,2582.13 3703.76,2582.36 3704.93,2583.53 3707.01,2583.53 3709.09,2585.61 3709.09,2592.09 v1(3711,2594)
  L1_TOP w6: R167.1@1269,1133.56 1272.94,1133.56 1297.85,1158.47 1297.85,1189.5 1295,1192.35 v1(1295,1225) ; v1(2031,3253) M29.52@2153.5,3253 ; M29.52@2154.5,3254 2202.02,3254 2223.02,3233 2477.39,3233 2494,3249.62 2494,3291.08 2500.92,3298 2656,3298 2688.31,3330.31 2705.57,3330.31 2716.25,3341 2749,3341 2762,3328 2762,3325.23 2789.18,3298.05 2975.2,3298.05 2979.3,3293.95 2979.3,3194.65 2932,3147.34 2932,3031.47 2963.31,3000.16 2965.66,3000.16 2985.25,2980.57 2985.25,2962.25 3048,2899.51 3048,2842.49 3039.51,2834 3033.62,2834 2999.6,2799.98 2999.6,2754.02 3003.7,2749.92 3046.51,2749.92 3050.61,2754.02 3050.61,2761.22 3071,2781.62 3071,2809.47 3075.53,2814 3178.19,2814 3197.19,2795 3232.81,2795 3242.81,2805 3263.47,2805 3269,2799.47 3269,2716.62 3280.62,2705 3288.62,2705 3308.62,2725 3346.31,2725 3353.83,2717.48 3412.74,2717.48 3425.74,2730.48 3425.74,2737.92 3420.07,2743.59 3420.07,2754.36 3427.69,2761.98 3438.46,2761.98 3454,2746.43 3454,2739.97 3456.47,2737.5 3456.47,2728.85 3452,2724.38 3452,2713.62 3459.62,2706 3471.1,2706 3480.68,2715.58 3489.19,2715.58 3490.62,2717 3572.26,2717 3583.02,2706.24 3583.02,2698.78 3577.75,2693.51 3577.22,2693.51 3573.22,2689.51 3573.22,2684.54 3583.02,2674.74 3583.02,2667.29 3574.63,2658.89 3574.04,2658.89 3566.64,2651.49 3566.64,2646.51 3570.15,2643 3673.44,2643 3683.48,2632.96 3683.48,2604.5 3688.87,2604.5 3698.21,2595.15 3709.85,2595.15 v1(3711,2594)
  L8_BOTTOM w6: v1(1295,1225) 1293.85,1226.15 1293.85,1230.39 1292.49,1231.76 1292.49,2346.1 2008,3061.62 2008,3230 v1(2031,3253)
PB11: M29.51 R166.1 U1A.P12 | length 6875.7
  L1_TOP w6: R166.1@1201,1133.56 1202,1134.56 v1(1202,1172) ; M29.51@2358.5,3255 v1(2481,3255) ; v1(3732.05,2577.07) 3731.5,2577.62 U1A.P12@3731.5,2576.53 3730.96,2575.98 3730.96,2571.4 3714.76,2555.21 3714.76,2543.39 3722.38,2535.77 3876.86,2535.77 3884.63,2528 3945,2528 3990,2483 3992.3,2483 4007.45,2467.86 4007.45,2412.83 3987,2392.38 3987,2385.62 3977,2375.62 3977,2333 v1(3976,2332)
  L3_HS1 w6: v1(1202,1172) 1201,1173 1201,1234.38 1862.62,1896 1864.67,1896 1989,2020.33 1989,2031.14 2242.86,2285 2248.62,2285 2277.23,2313.62 2479.48,2313.62 2508.1,2285 2631.15,2285 2657.15,2311 2862.47,2311 2872.47,2301 2891.53,2301 2901.53,2311 3302.53,2311 3349.53,2264 3477.9,2264 3478.9,2265 3620.05,2265 3632.05,2253 3795.38,2253 3813.38,2271 3813.38,2296.38 3853,2336 3911.69,2336 3915.69,2332 v1(3976,2332)
  L8_BOTTOM w6: v1(1202,1172) 1227,1197 1303.49,1197 1318,1211.51 1318,2338 2020,3040 2036.38,3040 2251.38,3255 v1(2481,3255)
PB12: M29.46 R165.1 SB17.2 U1A.T14 | length 5924.1
  L1_TOP w4: U1A.T14@3794.5,2513.54 3803.03,2505 3827.97,2505 3837.99,2494.98 3837.99,2460.99 v1(3829,2452)
  L1_TOP w6: SB17.2@913,1161 947.49,1161 951,1164.51 v1(951,1180) 967.44,1163.56 R165.1@967.44,900 ; v1(1995,3102) 2152.5,3102 M29.46@2153.5,3103 ; M29.46@2154.5,3104 2202.02,3104 2213.02,3093 2213.02,3080.9 2251.4,3042.52 2251.4,2963.37 2289.77,2925 2421.9,2925 2426.01,2920.9 2426.01,2767.91 2441.09,2752.83 2507.92,2752.83 2512.02,2756.93 2512.02,2823.75 2546.27,2858 2727.49,2858 2745,2840.49 2745,2680.51 2748.51,2677 2814.36,2677 2820.7,2683.34 2929.8,2683.34 2941.28,2671.86 2941.28,2669.88 2945.38,2665.78 2986.62,2665.78 3024.18,2703.34 3106.16,2703.34 3108.49,2701 3165.51,2701 3182.56,2718.05 3182.56,2733.95 3190.62,2742 3201.38,2742 3232,2711.38 v1(3232,2710)
  L6_HS2 w6: v1(3232,2710) 3260,2682 3270.16,2682 3277.39,2674.77 3283.39,2674.77 3299.61,2691 3310.38,2691 3326.38,2675 3326.38,2656 3347,2635.38 3347,2594.77 3365,2576.77 3365,2569.67 3376,2558.67 3376,2545.57 3405.57,2516 3503,2516 3555,2464 3555,2413.38 3560,2408.38 3560,2390.51 3563.51,2387 3617.62,2387 3619.62,2389 3690,2389 3696,2383 3696.24,2383 3700.24,2379 3743.71,2379 3751.71,2371 3781.05,2371 3784.05,2374 3855.5,2374 3859.5,2370 3905.95,2370 3908.95,2367 3925.9,2367 3934,2375.1 3934,2385.38 3923.38,2396 3877.38,2396 3859.38,2414 3840.62,2414 3826,2428.62 3826,2439.38 3827.85,2441.24 3827.85,2450.85 v1(3829,2452)
  L8_BOTTOM w6: v1(951,1180) 951.3,1180.3 951.3,1195 973.3,1217 1268.62,1217 1282.49,1230.87 1282.49,2354.49 1575,2647 1995,3067 v1(1995,3102)
PB13: M29.44 R65.2 R164.1 U1A.U14 | length 7215.1
  L1_TOP w6: v1(925,826) 961.44,826 R164.1@965.44,822 ; v1(2031,3053) M29.44@2153.5,3053 ; R65.2@3626,2252.56 3626,2275.34 3643.66,2293 3659.38,2293 3710.5,2344.12 3710.5,2360.88 3761.62,2412 3769.04,2412 3791.84,2434.8 3793.12,2436.08 3793.12,2443.39 v1@3792.62,2443.89 ; v1(3794.27,2442.24) 3794.27,2443.87 3785,2453.14 3785,2472.54 U1A.U14@3794.5,2482.04
  L3_HS1 w6: v1(925,826) 888,863 888,935.53 1858.47,1906 1860.53,1906 1979,2024.47 1979,2035.28 2238.72,2295 2244.47,2295 2273.09,2323.62 2534,2323.62 2554,2303.62 2554,2302.62 2561.62,2295 2627.01,2295 2653.01,2321 2866.62,2321 2876.62,2311 2887.38,2311 2897.38,2321 3306.67,2321 3353.67,2274 3473.76,2274 3474.76,2275 3624.19,2275 3636.19,2263 3702.28,2263 3709.28,2270 v1(3777,2270)
  L8_BOTTOM w6: v1(925,826) 978,879 978,1198.7 986.3,1207 1295.38,1207 1308,1219.62 1308,2344 2017,3053 v1(2031,3053) ; v1(3777,2270) 3754,2293 3754,2404.38 3761.62,2412 3764.02,2412 v1(3794.27,2442.24)
PB14: M29.45 SB18.2 SB19.2 U1A.U15 | length 9727.9
  L1_TOP w6: SB18.2@555,4104 555,4102.34 565,4092.34 v1(565,4066) ; v1(805,1296) 806.62,1296 812.62,1302 SB19.2@860,1302 ; v1(2481,3105) 2256.56,3105 2236.57,3125 2013.75,3125 2003.76,3115 1989.62,3115 1982,3107.38 1982,2995.92 1873,2886.92 1873,2587.08 1985.09,2475 2251.09,2475 2293.08,2433 2445.83,2433 2481.78,2397.06 2481.78,2256.22 v1(2544.6,2193.4) ; v1(3823,2493) 3823,2491.38 3825.45,2488.93 3825.45,2482.59 U1A.U15@3825.99,2482.04
  L3_HS1 w6: v1(565,4066) 515,4016 515,3516 613,3418 760.49,3418 764,3414.49 764,1299.51 767.51,1296 v1(805,1296)
  L5_SIG w6: v1(2544.6,2193.4) 2608.2,2257 2781.19,2257 2785.19,2261 2898.57,2261 3002.57,2157 3012.33,2157 3015.33,2154 3042.67,2154 3221.67,2333 3345.66,2333 3357.77,2320.89 3400.02,2320.89 3411.12,2332 3437.85,2332 3450.85,2319 3674.47,2319 3698.47,2343 3770.19,2343 3791.19,2364 3826.81,2364 3840.8,2350.01 3848.19,2350.01 3901.25,2403.07 3901.25,2464.89 3873.14,2493 v1(3823,2493)
  L8_BOTTOM w6: v1(565,4066) 565,3283.51 568.51,3280 2474.38,3280 2496,3258.38 2496,3120 v1(2481,3105)
PB15: M29.47 SB21.2 SB22.2 U1A.T15 | length 3510.8
  L1_TOP w4: U1A.T15@3825.99,2513.54 3826.53,2513 3831.28,2513 3848.49,2495.8 3848.49,2443.49 v1(3839,2434)
  L1_TOP w6: v1(1547,3323) SB21.2@1547,3377 ; M29.47@2358.5,3155 v1(2481,3155) ; v1(2547,2791) 2547,2789.79 2557,2779.79 SB22.2@2557,2718 2567.34,2718 2595,2690.34 v1(2653.16,2690.34)
  L3_HS1 w6: v1(2481,3155) 2468,3142 2468,2882.67 2506.93,2843.74 2506.93,2831.07 v1(2547,2791) ; v1(3703,2422) 3718.62,2422 3737.62,2441 3737.62,2457 3758.62,2478 3769.38,2478 3790.81,2456.57 3806.04,2456.57 3827.47,2435.15 3837.85,2435.15 v1(3839,2434)
  L5_SIG w6: v1(2653.16,2690.34) 2653.5,2690 2946.62,2690 3214.62,2422 3236.29,2422 3255.29,2403 3301,2403 3319,2385 3443.62,2385 3448.62,2380 3457.73,2380 3470.73,2367 3654.59,2367 3660.8,2373.2 3660.8,2381.41 3683,2403.62 3683,2418.49 3686.51,2422 v1(3703,2422)
  L8_BOTTOM w6: v1(1547,3323) 1580,3290 2478.53,3290 2506,3262.53 2506,3111.62 2486.38,3092 2475.62,3092 2468,3099.62 2468,3142 v1(2481,3155)
PC0: M16.14 M29.01 R192.2 U1A.L2 | length 4822.5
  L1_TOP w4: v1(3291,2655) 3293.16,2655 3298.16,2650 3311.97,2650 3322,2660.03 3351.81,2660.03 3381.31,2630.53 3388.77,2630.53 3394.65,2636.41 3394.65,2649.12 U1A.L2@3416.54,2671.02
  L1_TOP w6: M16.14@1544.27,1577 1643.02,1577 1644.36,1575.66 1705.95,1575.66 1827.62,1454 2302.58,1454 2323.3,1433.28 2556.78,1433.28 2577.56,1454.06 R192.2@2577.56,1458 2566.78,1468.78 2566.78,1482.6 2564,1485.38 v1(2564,1487) ; M29.01@2358.5,2005 v1(2481,2005)
  L5_SIG w6: v1(2481,2005) 2481,2160.49 2591.51,2271 2902.72,2271 3006.72,2167 3016.47,2167 3019.47,2164 3038.53,2164 3217.53,2343 3349.8,2343 3361.91,2330.89 3395.88,2330.89 3406.98,2342 3441.99,2342 3454.99,2329 3670.33,2329 3694.33,2353 3766.05,2353 3787.05,2374 3845.38,2374 3887.11,2415.72 3887.11,2464.89 3875.99,2476 3838.34,2476 3831.34,2469 3809.62,2469 3802,2476.62 3802,2510.36 3805.51,2513.88 3857.45,2513.88 3860.97,2517.39 3860.97,2522.36 3847.84,2535.49 3843.13,2535.49 3830,2548.62 3830,2557.38 3819.38,2568 3808.62,2568 3803.62,2563 3758.14,2563 3747.53,2573.62 3747.53,2579.98 3737.44,2590.07 3726.67,2590.07 3687.01,2550.42 3687.01,2548.48 3655.53,2517 3551.67,2517 3541.67,2507 3491.33,2507 3472.33,2488 3441.14,2488 3389.14,2540 3356.38,2540 3343.35,2526.96 3314.58,2526.96 3270.26,2571.28 3270.26,2641.65 3282.47,2653.85 3289.85,2653.85 v1(3291,2655)
  L6_HS2 w6: v1(2481,2005) 2481,1570 v1(2564,1487)
PC1: M29.02 SB23.2 SW1.8 U1A.M2 | length 10068.7
  L1_TOP w4: v1(3286,2639) 3287.04,2640.04 3313.32,2640.04 3325.31,2652.03 3348.5,2652.03 3378,2622.53 3410.53,2622.53 3416.54,2628.54 U1A.M2@3416.54,2639.52
  L1_TOP w6: SB23.2@1568,1783 1569,1782 v1(1613,1782) ; v1(1999,2005) 2151.5,2005 M29.02@2153.5,2003
  L3_HS1 w6: v1(1999,2005) 1999,2024.33 2158.64,2183.97 2158.64,2186.64 2247,2275 2257,2275 v1(2282.62,2300.62) ; v1(3181,2474) 3212,2505 3212,2565 3235,2588 3235,2600.12 3264.88,2630 3277,2630 v1(3286,2639)
  L4_POWER w6: v1(1613,1782) 1613,2518 1674,2579 1674,3502.38 1417,3759.38 1417,4040 1730,4353 2156.38,4353 2515.38,4712 2964.62,4712 2976.62,4700 3822.56,4700 SW1.8@4398.52,4124.04
  L5_SIG w6: v1(2282.62,2300.62) 2282.62,2622.76 2220.99,2684.38 2220.99,2766.49 2224.51,2770 2476.86,2770 2716.74,2530.12 2716.74,2519.88 2956.62,2280 2973.38,2280 2981,2287.62 2981,2298.38 2921,2358.38 2921,2366.53 2887.88,2399.64 2887.83,2399.64 2848,2439.47 2848,2441.38 2823.38,2466 2813.62,2466 2640.16,2639.45 2640.16,2695.73 2697.61,2753.17 2901.83,2753.17 v1(3181,2474)
  L6_HS2 w6: v1(1613,1782) 1836,2005 v1(1999,2005)
PC2: M30.02 SW1.2 U1A.M3 | length 8886.7
  L1_TOP w2: v1(3433.07,2654.49) U1A.M3@3448.04,2639.52
  L1_TOP w6: v1(4513,2057) 4513,2042 4524,2031 M30.02@4568,2031
  L3_HS1 w6: v1(4513,2057) 4682,2226 4967.62,2226 4983.62,2242 5383,2242 5404.51,2263.51 5404.51,2273.87 5284.38,2394 4903,2394 4899.49,2397.51 4899.49,2402.87 5156.62,2660 5261,2660 5264.51,2656.49 5264.51,2644.57 5256.12,2636.17 5256.12,2552.88 v1(5268,2541)
  L5_SIG w6: v1(3433.07,2654.49) 3434.22,2653.34 3434.22,2646.62 3465.83,2615 3502.62,2615 3506.62,2619 3527.47,2619 3537.47,2609 3635.91,2609 3651.28,2624.36 3651.28,2629.64 3666.64,2645 3671.91,2645 3711.91,2685 3758.61,2685 3762.12,2681.49 3762.12,2646.49 3773.62,2635 3784.38,2635 3803.38,2654 3804.33,2654 3819.63,2669.3 3831.38,2669.3 3852.5,2690.43 3852.5,2696.03 3908.27,2751.8 3957.81,2751.8 3990.62,2719 4004.38,2719 4057,2666.38 4057,2454.1 4082.52,2428.58 4082.52,2415.33 4071,2403.81 4071,2231.47 4087,2215.47 4087,2090.28 4168.28,2009 4580,2009 4595.43,1993.57 4868.24,1993.57 4880.67,2006 5110.34,2006 5113.86,2009.51 5113.86,2197.42 5106.24,2205.04 5029.05,2205.04 4926.01,2102 4558,2102 v1(4513,2057) ; v1(5092,3782) 5165.54,3708.46 5282.92,3708.46 5626,3365.38 5626,3210 5598,3182 5563.76,3182 5547.76,3166 5547.76,3150.57 5540,3142.81 5540,3094.21 5560,3074.21 5560,3025.62 5488.38,2954 v1(5366,2954)
  L8_BOTTOM w6: SW1.2@4634.74,4253.96 4749.04,4139.66 4749.04,4064.42 4741,4056.38 4741,4007.38 4709.62,3976 4689.65,3976 4622,3908.35 4622,3902.14 4563,3843.14 4563,3839.99 4560,3836.99 4560,3826.09 4499,3765.09 4499,3692.62 4506.62,3685 4517.38,3685 4545,3712.62 4545,3776.66 4680.69,3912.34 4685.66,3912.34 4833,3765 5017.81,3765 5024.81,3772 5082,3772 v1(5092,3782) ; v1(5268,2541) 5268,2611.28 5282.12,2625.4 5282.12,2847.45 5366,2931.33 v1(5366,2954)
PC2_C: M29.12 U1A.R1 | length 2667
  L1_TOP w6: M29.12@2155.5,2255 2244.2,2255 2270.2,2229 v1(2323,2229) ; v1(3270,2534) 3291,2555 3318.19,2555 3321.19,2558 3372.08,2558 U1A.R1@3385.05,2545.03
  L5_SIG w6: v1(2323,2229) 2362,2268 2574.37,2268 2587.37,2281 2906.86,2281 3010.86,2177 3020.62,2177 3023.62,2174 3034.38,2174 3213.38,2353 3353.95,2353 3366.05,2340.89 3391.73,2340.89 3402.84,2352 3446.13,2352 3459.13,2339 3666.19,2339 3690.19,2363 3761.9,2363 3782.9,2384 3814.38,2384 3825,2394.62 3825,2404.38 3830,2409.38 3830,2424.38 3826,2428.38 3826,2436.38 3807.14,2455.24 3806.28,2455.24 3764.53,2497 3559.95,2497 3549.95,2487 3499.62,2487 3480.62,2468 3423.47,2468 3412.47,2457 3391.47,2457 3387.47,2453 3363.53,2453 3325.53,2491 3313,2491 v1(3270,2534)
PC3: M29.37 SW1.6 U1A.M4 | length 10908
  L1_TOP w2: U1A.M4@3479.54,2639.52 3479.77,2639.75 3479.77,2652.77 v1(3480,2653)
  L1_TOP w6: v1(2233.99,2903) M29.37@2356.5,2903 ; SW1.6@4634.74,4124.04 4599.18,4159.6 4599.18,4268.69 4620.01,4289.52 4834.52,4289.52 4937,4392 4954,4392 v1(5322,4760)
  L3_HS1 w6: v1(1601,3745.82) 1601,3963 1585,3979 1585,4128.69 1586,4129.69 1586,4279.38 1617.62,4311 1637.38,4311 1897.35,4570.96 1897.35,4594.73 2106.62,4804 2756.53,4804 2907.53,4955 3201.47,4955 3207.47,4961 3226.53,4961 3248.22,4939.31 3259.17,4939.31 3262.47,4936 3326,4936 3365,4897 3995.38,4897 4132.38,4760 v1(5322,4760)
  L5_SIG w6: v1(2233.99,2903) 2208,2877.01 2208,2461 2252,2417 2252,2236.62 2079.38,2064 1931.51,2064 1902,2093.51 1902,2419.98 1901,2420.98 1901,2660.53 1914,2673.53 1914,2919 2001,3006 2244.71,3006 2250.71,3000 3176.12,3000 3240.12,2936 3247.3,2936 3269.3,2914 3286.7,2914 3304.7,2932 3395.41,2932 3420.07,2907.34 3420.07,2901.07 3430.9,2890.24 3436.17,2890.24 3447,2879.42 3447.97,2879.42 3461,2866.38 3461,2855.62 3434.83,2829.45 3432.17,2829.45 3406,2803.28 3406,2705 3412.02,2698.98 3438.46,2698.98 3447,2690.44 3447,2673.09 3456.07,2664.02 3456.07,2658 3461.07,2653 v1(3480,2653)
  L6_HS2 w6: v1(1601,3745.82) 1601,3518.62 2216.62,2903 v1(2233.99,2903)
PC3_C: M29.14 U1A.R2 | length 2929.6
  L1_TOP w4: v1(3293,2465) 3293.09,2465.09 3293.09,2500.09 3320.96,2527.96 3399.48,2527.96 U1A.R2@3416.54,2545.03
  L1_TOP w6: M29.14@2155.5,2305 2203.02,2305 2224.88,2326.85 2227.85,2326.85 v1(2229,2328)
  L5_SIG w6: v1(2229,2328) 2206,2305 1961.76,2305 1944,2322.76 1944,2901.72 2000.28,2958 3128.63,2958 3143,2943.63 3143,2660.81 3140,2657.81 3140,2622.19 3143,2619.19 3143,2586.86 3202.86,2527 3202.95,2527 3234,2495.95 3234,2495 3264,2465 v1(3293,2465)
PC4: M29.27 R134.1 U1A.T4 | length 7239.1
  L1_TOP w4: U1A.T4@3479.54,2513.54 3488.54,2504.54 3488.54,2475.54 3488,2475 3488,2446 v1(3511,2423)
  L1_TOP w6: v1(2233.99,2653) M29.27@2356.5,2653 ; R134.1@3456.56,4306 3457.56,4305 v1(3511,4305)
  L3_HS1 w6: v1(2233.99,2653) 2235.14,2653 2288.66,2599.49 2561.16,2599.49 2573.64,2587 2846.57,2587 2897,2536.57 2897,2474.14 3020.14,2351 3319.1,2351 3349.1,2321 3478.33,2321 3482.33,2325 3509.67,2325 3514.67,2320 3621.62,2320 3648.62,2293 3659.38,2293 3667,2300.62 3667,2323.14 3656.14,2334 3635.9,2334 3629.9,2340 3522.95,2340 3517.95,2345 3353.38,2345 3327.38,2371 3315.86,2371 3289,2397.86 3289,2399.53 3275.53,2413 3215.53,2413 3202.53,2426 3165.72,2426 3154,2437.72 3154,2454.33 3148,2460.33 3148,2486.86 3140,2494.86 3140,2575.28 3124.28,2591 2969.38,2591 2968.38,2590 2912.86,2590 2892.34,2610.51 2892.34,2625.95 2900,2633.6 2900,2635.53 2913.47,2649 2938.47,2649 3120.74,2831.26 3131.41,2831.26 3154.35,2854.21 3158.54,2854.21 3197.33,2893 3230.53,2893 3249.53,2912 3292.14,2912 3301.14,2921 3341.66,2921 3371.66,2951 3465.62,2951 3473.62,2943 3542.38,2943 3554,2931.39 3554,2914.51 3530.49,2891 3490.3,2891 3481.82,2891 3461,2870.18 3461,2855.62 3451.35,2845.96 3429.49,2845.96 3410.53,2827 3391.47,2827 3365.49,2852.99 3355.67,2852.99 3312,2809.31 3312,2780.51 3315.51,2777 3319.53,2777 3347,2749.53 3347,2720 3359.49,2707.51 3359.49,2649.83 3347,2637.34 3347,2624.62 3317.41,2595.02 3299.67,2595.02 3294.7,2600 3277.3,2600 3265,2587.7 3265,2570.3 3273,2562.3 3273,2554.4 3279,2548.4 3279,2543.38 3288.96,2533.42 3288.96,2498.61 3296.58,2491 3325.53,2491 3343.53,2473 3354.53,2473 3364.53,2463 3386.38,2463 3422.38,2427 3447.38,2427 3471,2450.62 3471,2458.38 3494.62,2482 3505.38,2482 3520,2467.38 3520,2433.62 3511,2424.62 v1(3511,2423)
  L6_HS2 w6: v1(2233.99,2653) 2274,2693.01 2274,2890.86 2398,3014.86 2398,3455.86 2796,3853.86 2796,4020.86 3081.14,4306 3490.87,4306 3491.87,4305 v1(3511,4305)
PC5: M29.28 R135.1 U1A.U4 | length 5446
  L1_TOP w6: v1(1924,2651) 2149.5,2651 M29.28@2152.5,2654 ; R135.1@3456.56,4256 3457.56,4255 v1(3512,4255) ; U1A.U4@3479.54,2482.04 3479,2481.5 3479,2437.53 3492,2424.53 v1(3492,2424)
  L5_SIG w6: v1(1924,2651) 1924,2652.21 1934,2662.21 1934,2905.86 1996.14,2968 3146.49,2968 3153,2961.49 3153,2656.67 3150,2653.67 3150,2626.33 3153,2623.33 3153,2591 3207,2537 3207.1,2537 3244,2500.1 3244,2500 3266,2478 3305.12,2478 3308.12,2481 3321.38,2481 3329,2473.38 3329,2465.1 3330.5,2463.6 3330.5,2446.12 3339.62,2437 3385.62,2437 3394.62,2446 3415.62,2446 3427.62,2458 3452.38,2458 3464.38,2446 3476.97,2446 3483.49,2439.49 3483.49,2432.9 3492,2424.38 v1(3492,2424)
  L6_HS2 w6: v1(1924,2651) 1960.14,2651 1971.14,2640 2239.38,2640 2284,2684.62 2284,2886.72 2408,3010.72 2408,3451.72 2806,3849.72 2806,4016.72 3085.28,4296 3471,4296 v1(3512,4255)
PC6: M30.45 SB24.2 U1A.F14 | length 3249.6
  L1_TOP w2: v1(3779.53,2843.46) U1A.F14@3794.5,2828.5
  L1_TOP w6: v1(4688.13,3131) M30.45@4770.99,3131 ; SB24.2@4724,3618 4751,3618 v1(4782,3587)
  L6_HS2 w6: v1(4688.13,3131) 4688.13,3203 4675.13,3216 4675.13,3361.75 4728.57,3415.18 4728.57,3533.57 v1(4782,3587)
  L8_BOTTOM w6: v1(3779.53,2843.46) 3779.53,2802.32 3782,2799.85 3782,2760.33 3781,2759.33 3781,2741.62 3788.82,2733.79 3799.18,2733.79 3811.76,2746.37 3816.73,2746.37 3820.24,2742.86 3822,2739.62 3829.62,2732 3840.38,2732 3886.92,2759.76 3907.78,2780.62 3909.12,2800.06 3909.12,2825.18 3909,2825.3 3909,2842.7 3913.78,2847.48 3913.85,2939.85 3972.01,3001.92 3980.01,3014.22 3980.01,3077.67 3973,3084.67 3973,3088.42 3956.81,3104.62 3956.81,3115.38 3962,3120.58 3962,3380.77 3956,3442.53 3943.91,3454.61 3943.91,3493.54 3961.37,3511 4007.74,3511 4091,3427.74 4091,3089.73 4115,3065.73 4115,2997.7 4099.78,2982.49 4099.78,2869.83 4194.62,2775 4294.27,2775 4589.27,3070 4610.15,3070 4633,3092.85 4633,3113.73 4650.27,3131 v1(4688.13,3131)
PC7: M18.E3 M30.42 R202.2 U1A.F13 | length 2344.9
  L1_TOP w2: M18.E3@4356.5,3585.5 4356.5,3572.5 v1(4367,3562)
  L1_TOP w4: v1(3743,2818) 3744.53,2819.53 3754.03,2819.53 U1A.F13@3763,2828.5
  L1_TOP w6: R202.2@4120.56,3673 4120.56,3669.39 4131.34,3658.61 4147.39,3658.61 v1(4158,3648) ; v1(4367,3562) 4367,3323.21 4380,3310.21 4380,3304.61 4382,3302.61 4382,3255.39 4380,3253.39 4380,3073.04 4422.03,3031.01 ; v1(4394,3025) 4400,3031 4422.03,3031 ; M30.42@4568,3031 4422.03,3031
  L3_HS1 w6: v1(4158,3648) 4220.19,3648 4252.19,3616 4314.38,3616 4367,3563.38 v1(4367,3562) ; v1(4221,3035) 4222.21,3035 4232.21,3025 v1(4394,3025)
  L4_POWER w6: v1(3743,2818) 3769,2792 3801.5,2792 3820.5,2773 3851.38,2773 3859,2780.62 3859,2894 3850.19,2902.81 3850.19,2914.19 3839.98,2924.4 3819.21,2924.4 3801,2942.62 3801,2945.38 3773.38,2973 3760.27,2973 3708,3025.27 3708,3067.49 3711.51,3071 3718.73,3071 3725.62,3064.11 3730.59,3064.11 3741.47,3075 3763.32,3075 3767.68,3070.64 3789.64,3070.64 3790,3071 3812.19,3071 3820.19,3063 3874.86,3063 3875.86,3062 3930.53,3062 3946.01,3046.52 3946.01,3038.04 3986.05,2998 4032.95,2998 4042.95,3008 4097.01,3008 4114.01,3025 4122.38,3025 4122.72,3025.33 4163.23,3025.33 4171.56,3017 4203,3017 v1(4221,3035)
PC8: M18.D1 M30.44 U1A.E13 | length 3731.6
  L1_TOP w2: v1(4272,3572) 4295.76,3572 M18.D1@4325.01,3601.25
  L1_TOP w4: v1(3721,2848) 3721.99,2848.99 3752,2848.99 U1A.E13@3763,2859.99 ; v1(4490,3109) 4492.16,3109 4496.16,3105 v1(4657,3105)
  L1_TOP w6: M30.44@4568,3081 4637,3081 4655.85,3099.85 4655.85,3103.85 v1(4657,3105)
  L8_BOTTOM w4: v1(3721,2848) 3719.84,2846.84 3702.27,2846.84 3691.04,2835.61 3691.04,2787.29 3682,2778.25 3682,2733.75 3704.4,2711.34 3705.48,2711.34 3741.82,2675 3782.89,2675 3797.23,2660.66 3821.32,2660.66 3837.99,2677.33 3837.99,2698.1 3916.78,2776.89 3918.12,2797.32 3918.12,2828.25 3918,2829.03 3918,2838.97 3922.78,2843.75 3942.26,2874.02 3942.26,2883.96 3929.38,2909.03 3922.85,2926.18 3922.85,2936.12 3981.01,2998.2 3989.01,3010.49 3989.01,3081.39 3982,3088.4 3982,3092.15 3981.81,3106.49 3981.81,3114.97 3979.76,3117.02 3971,3384.5 3965,3446.25 3952.91,3458.34 3952.91,3489.81 3965.1,3502 4003.91,3502 4058.25,3447.66 4058.25,3125.29 4082,3101.54 4082,3086 4106,3062 4106,3001.43 4090.78,2986.21 4090.78,2866.1 4190.89,2766 4298,2766 4593,3061 4613.88,3061 4657,3104.12 v1(4657,3105) ; v1(4272,3572) 4272,3532 4344,3460 4344,3391.02 4273.33,3320.35 4273.33,3286.56 4362.21,3197.68 4401.32,3197.68 v1(4490,3109)
PC9: M18.E1 M30.53 R200.2 U1A.E14 | length 2235
  L1_TOP w2: v1(3779.53,2874.96) U1A.E14@3794.5,2859.99
  L1_TOP w4: R200.2@4161.56,3573 4180,3573 v1(4212,3605) ; v1(4312,3561) 4312,3572.5 M18.E1@4325.01,3585.5
  L1_TOP w6: v1(4665,3370) 4685,3350 4685,3346.48 4700.48,3331 M30.53@4770.99,3331
  L4_POWER w6: v1(3904,3326) 4057,3326 v1(4071,3312) 4071,3313.62 4072.61,3315.23 4072.61,3321.61 v1(4312,3561)
  L5_SIG w6: v1(3779.53,2874.96) 3829.52,2924.95 3846.35,2924.95 3880.39,2959 3899.73,2959 3958,3017.27 3958,3078.49 3982.81,3103.29 3982.81,3105.33 3990.81,3113.33 3990.81,3120.11 3920,3190.92 3920,3234.73 3905,3249.73 3905,3291.62 3904,3292.62 v1(3904,3326)
  L8_BOTTOM w4: v1(4212,3605) 4212,3604.18 4228.18,3588 4285,3588 4288,3585 4288,3576.03 4295.03,3569 4304,3569 v1(4312,3561)
  L8_BOTTOM w6: v1(4312,3561) 4312,3559.38 4303,3550.38 4303,3513.73 4353,3463.73 4353,3387.29 4287,3321.29 4287,3285.62 4304.62,3268 4321.86,3268 4423.86,3370 v1(4665,3370)
PC10: M18.A1 U1A.A13 | length 1413.9
  L1_TOP w2: v1(4281,3674) 4299.5,3674 M18.A1@4325.01,3648.5
  L1_TOP w6: U1A.A13@3763,2985.98 3795,3017.98 v1(3795,3044)
  L8_BOTTOM w6: v1(3795,3044) 3796.62,3044 3805.62,3053 3861.81,3053 3880,3071.19 3880,3264 3763.23,3380.77 3763.23,3683.23 3775,3695 4260,3695 v1(4281,3674)